# Altium PCB MCU.pcbdoc (part 2 of 2)
Units mil, origin at the board's own origin, x right, y up, seen from the top; angles counter-clockwise.
Board outline 2362.2 x 2637.8 mil, 2 copper layers (Top Layer, Bottom Layer), stack 62.2 mil thick; 37 components, 44 nets, 211 pads, 87 vias.
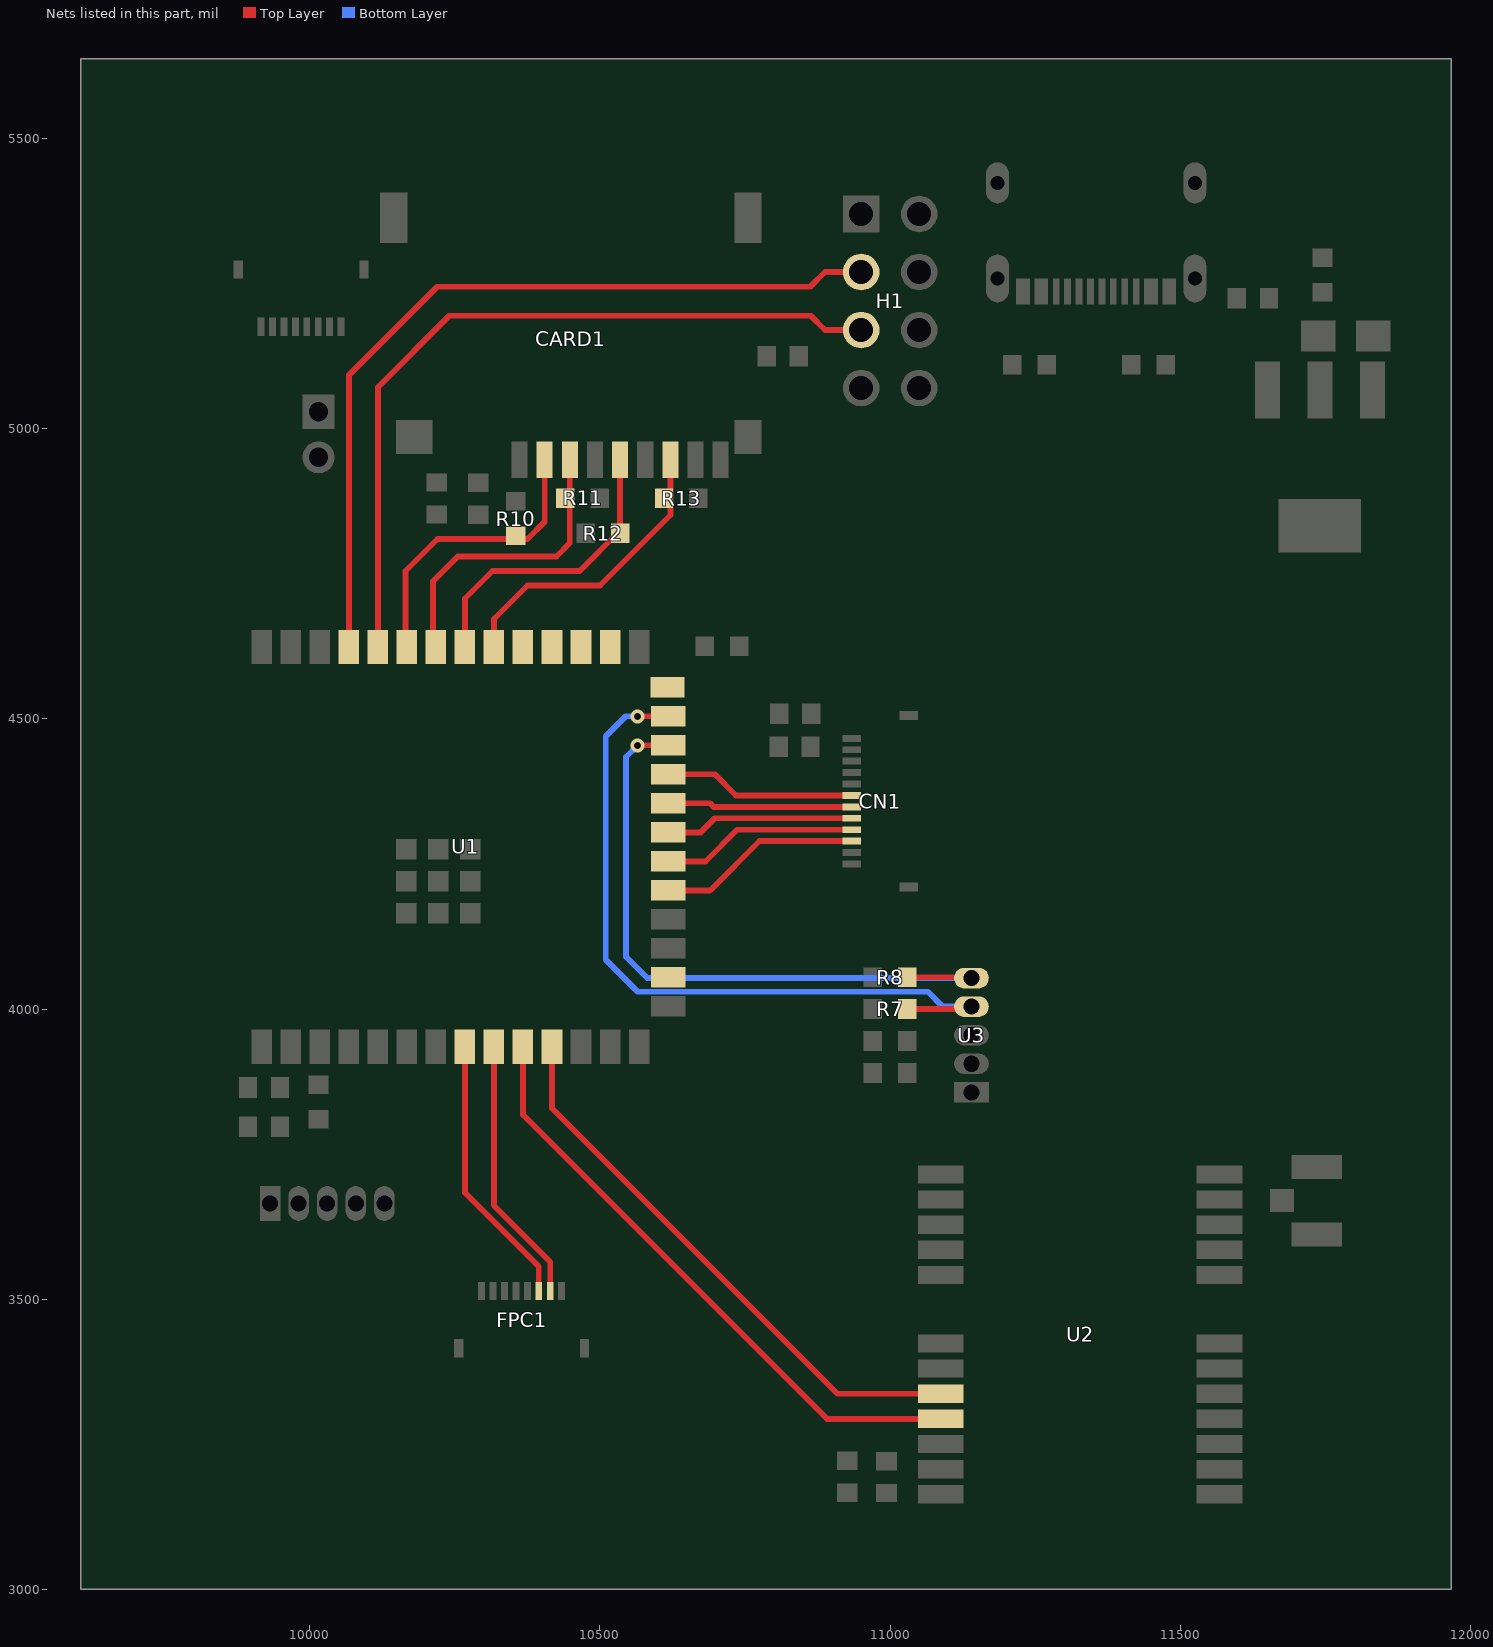
[diagram p2: the nets of this part, all layers, seen from the top]

## Via types
v1: diameter 24, hole 12, Top Layer to Bottom Layer, 87 vias

## Nets (pads, with @x,y where several pads share a name; then routed paths per layer and width w, separated by ;. In a path a pad name is that pad's centre, name@x,y a point inside that pad or via, vN(x,y) a via of type N, cw(c..) or ccw(c..) an arc to the next point about the centre after c; other vN are vias at no path point) (continued)
GPIO_11: CN1.3 U1.19 | length 351.2
  Top Layer w10: U1.19@10617.7,4204.5 10689.8,4204.5 10774.7,4289.4 CN1.3@10933.7,4289.4
GPIO_12: CN1.4 U1.20 | length 338.6
  Top Layer w10: U1.20@10617.7,4254.5 10681.7,4254.5 10736.2,4309.1 CN1.4@10933.7,4309.1
GPIO_13: CN1.5 U1.21 | length 326
  Top Layer w10: U1.21@10617.7,4304.5 10673.5,4304.5 10697.7,4328.7 CN1.5@10933.7,4328.7
GPIO_14: CN1.6 U1.22 | length 318.5
  Top Layer w10: U1.22@10617.7,4354.5 10689.8,4354.5 10695.9,4348.4 CN1.6@10933.7,4348.4
GPIO_15: FPC1.6 U1.8 | length 473.5
  Top Layer w10: U1.8@10267.3,3935 10267.3,3683.5 10394.5,3556.3 FPC1.6@10394.5,3514.2
GPIO_16: FPC1.7 U1.9 | length 460.9
  Top Layer w10: U1.9@10317.3,3935 10317.3,3661.3 10414.2,3564.4 FPC1.7@10414.2,3514.2
GPIO_17: U1.10 U2.21 | length 1054.1
  Top Layer w10: U1.10@10367.3,3935 10367.3,3817.7 10891.1,3293.9 U2.21@11087.1,3293.9
GPIO_18: U1.11 U2.20 | length 979.5
  Top Layer w10: U1.11@10417.3,3935 10417.3,3829 10909.1,3337.2 U2.20@11087.1,3337.2
GPIO_21: CN1.7 U1.23 | length 331.1
  Top Layer w10: U1.23@10617.7,4404.5 10698,4404.5 10734.4,4368.1 CN1.7@10933.7,4368.1
GPIO_35: U1.28
GPIO_36: U1.29
GPIO_37: U1.30
GPIO_38: U1.31
GPIO_39: CARD1.7 R13.1 U1.32 | length 521.4
  Top Layer w10: U1.32@10317.3,4624 10317.3,4672.3 10375,4730 10500,4730 10621.3,4851.3 CARD1.7@10621.3,4946.3
GPIO_40: CARD1.5 R12.1 U1.33 | length 520.9
  Top Layer w10: U1.33@10267.3,4624 10267.3,4707.3 10315,4755 10465,4755 10534.6,4824.6 CARD1.5@10534.6,4946.3
GPIO_41: CARD1.3 R11.1 U1.34 | length 521.6
  Top Layer w10: U1.34@10217.3,4624 10212.3,4629 10212.3,4737.3 10255,4780 10425,4780 10448,4803 CARD1.3@10448,4946.3
GPIO_42: CARD1.2 R10.1 U1.35 | length 513.3
  Top Layer w10: U1.35@10167.3,4624 10165,4626.3 10165,4755 10220,4810 10375,4810 10404.7,4839.7 CARD1.2@10404.7,4946.3
GPIO_45: U1.26
GPIO_46: U1.16
GPIO_47: R8.2 U1.24 U3.5 | length 1146.6
  Top Layer w10: v1(10565,4454.5) U1.24@10617.7,4454.5 ; R8.2@11029.7,4055 11138.4,4055 U3.5@11140,4053.4
  Bottom Layer w10: v1(10565,4454.5) 10545,4434.5 10545,4090 10581.6,4053.4 U3.5@11140,4053.4
GPIO_48: R7.2 U1.25 U3.4 | length 1282.5
  Top Layer w10: v1(10565,4504.5) U1.25@10617.7,4504.5 ; R7.2@11029.7,4000 11135.8,4000 U3.4@11140,4004.2
  Bottom Layer w10: v1(10565,4504.5) 10544.5,4504.5 10510,4470 10510,4085 10565,4030 11065,4030 11090.8,4004.2 U3.4@11140,4004.2
RXD0: H1.5 U1.36 | length 1341.4
  Top Layer w10: U1.36@10117.3,4624 10117.3,5071.6 10240.4,5194.6 10863.1,5194.6 10887.8,5170 H1.5@10950,5170
TXD0: H1.3 U1.37 | length 1424.6
  Top Layer w10: U1.37@10067.3,4624 10067.3,5092.3 10219.6,5244.6 10862.4,5244.6 10887.8,5270 H1.3@10950,5270
pads on no net: CARD1.1 CARD1.8 CARD1.CD CN1.10 CN1.11 U2.1 U2.2 U2.3 U2.4 U2.5 U2.6 U2.7 U2.8 U2.9 U2.14 U2.15 U2.16 U2.17 U2.18 U2.19 USB1.A8 USB1.B8

## Polygon pours and split planes (outlines as drawn)
GND on Top Layer (solid, remove dead copper, pour order 0): 9605,5637.8 9605,3000 11967.2,3000 11967.2,5637.8
GND on Bottom Layer (solid, remove dead copper, pour order 2): 9605,5637.8 9605,3000 11967.2,3000 11967.2,5637.8

## Keep-outs
Board Outline Layer:
  region: 9862.9,3196.9 9862.5,3189.9 9861.3,3183 9859.3,3176.3 9856.6,3169.9 9853.2,3163.9 9849.1,3158.2 9844.4,3153.1 9839.1,3148.5 9833.4,3144.6 9827.2,3141.3 9820.7,3138.8 9814,3137 9807.1,3136.1 9800.1,3135.9 9793.2,3136.4 9786.3,3137.8 9779.7,3140 9773.4,3142.9 9767.4,3146.5 9761.9,3150.7 9756.9,3155.6 9752.5,3161 9748.7,3166.8 9745.6,3173.1 9743.3,3179.7 9741.7,3186.4 9740.9,3193.4 9740.9,3200.3 9741.7,3207.3 9743.3,3214 9745.6,3220.6 9748.7,3226.9 9752.5,3232.7 9756.9,3238.1 9761.9,3243 9767.4,3247.2 9773.4,3250.8 9779.7,3253.7 9786.3,3255.9 9793.2,3257.3 9800.1,3257.8 9807.1,3257.7 9814,3256.7 9820.7,3254.9 9827.2,3252.4 9833.4,3249.1 9839.1,3245.2 9844.4,3240.6 9849.1,3235.5 9853.2,3229.8 9856.6,3223.8 9859.3,3217.4 9861.3,3210.7 9862.5,3203.8
  region: 9862.9,3196.9 9862.5,3189.9 9861.3,3183 9859.3,3176.3 9856.6,3169.9 9853.2,3163.9 9849.1,3158.2 9844.4,3153.1 9839.1,3148.5 9833.4,3144.6 9827.2,3141.3 9820.7,3138.8 9814,3137 9807.1,3136.1 9800.1,3135.9 9793.2,3136.4 9786.3,3137.8 9779.7,3140 9773.4,3142.9 9767.4,3146.5 9761.9,3150.7 9756.9,3155.6 9752.5,3161 9748.7,3166.8 9745.6,3173.1 9743.3,3179.7 9741.7,3186.4 9740.9,3193.4 9740.9,3200.3 9741.7,3207.3 9743.3,3214 9745.6,3220.6 9748.7,3226.9 9752.5,3232.7 9756.9,3238.1 9761.9,3243 9767.4,3247.2 9773.4,3250.8 9779.7,3253.7 9786.3,3255.9 9793.2,3257.3 9800.1,3257.8 9807.1,3257.7 9814,3256.7 9820.7,3254.9 9827.2,3252.4 9833.4,3249.1 9839.1,3245.2 9844.4,3240.6 9849.1,3235.5 9853.2,3229.8 9856.6,3223.8 9859.3,3217.4 9861.3,3210.7 9862.5,3203.8
  region: 9862.9,5440.9 9862.5,5434 9861.3,5427.1 9859.3,5420.4 9856.6,5414 9853.2,5408 9849.1,5402.3 9844.4,5397.2 9839.1,5392.6 9833.4,5388.7 9827.2,5385.4 9820.7,5382.9 9814,5381.1 9807.1,5380.1 9800.1,5379.9 9793.2,5380.5 9786.3,5381.9 9779.7,5384.1 9773.4,5387 9767.4,5390.6 9761.9,5394.8 9756.9,5399.7 9752.5,5405.1 9748.7,5410.9 9745.6,5417.2 9743.3,5423.8 9741.7,5430.5 9740.9,5437.5 9740.9,5444.4 9741.7,5451.4 9743.3,5458.1 9745.6,5464.7 9748.7,5471 9752.5,5476.8 9756.9,5482.2 9761.9,5487.1 9767.4,5491.3 9773.4,5494.9 9779.7,5497.8 9786.3,5500 9793.2,5501.3 9800.1,5501.9 9807.1,5501.7 9814,5500.8 9820.7,5499 9827.2,5496.5 9833.4,5493.2 9839.1,5489.3 9844.4,5484.7 9849.1,5479.6 9853.2,5473.9 9856.6,5467.9 9859.3,5461.5 9861.3,5454.8 9862.5,5447.9
  region: 9862.9,5440.9 9862.5,5434 9861.3,5427.1 9859.3,5420.4 9856.6,5414 9853.2,5408 9849.1,5402.3 9844.4,5397.2 9839.1,5392.6 9833.4,5388.7 9827.2,5385.4 9820.7,5382.9 9814,5381.1 9807.1,5380.1 9800.1,5379.9 9793.2,5380.5 9786.3,5381.9 9779.7,5384.1 9773.4,5387 9767.4,5390.6 9761.9,5394.8 9756.9,5399.7 9752.5,5405.1 9748.7,5410.9 9745.6,5417.2 9743.3,5423.8 9741.7,5430.5 9740.9,5437.5 9740.9,5444.4 9741.7,5451.4 9743.3,5458.1 9745.6,5464.7 9748.7,5471 9752.5,5476.8 9756.9,5482.2 9761.9,5487.1 9767.4,5491.3 9773.4,5494.9 9779.7,5497.8 9786.3,5500 9793.2,5501.3 9800.1,5501.9 9807.1,5501.7 9814,5500.8 9820.7,5499 9827.2,5496.5 9833.4,5493.2 9839.1,5489.3 9844.4,5484.7 9849.1,5479.6 9853.2,5473.9 9856.6,5467.9 9859.3,5461.5 9861.3,5454.8 9862.5,5447.9
  region: 11831.4,3196.9 11831,3189.9 11829.8,3183 11827.8,3176.3 11825.1,3169.9 11821.7,3163.9 11817.6,3158.2 11812.9,3153.1 11807.6,3148.5 11801.9,3144.6 11795.7,3141.3 11789.2,3138.8 11782.5,3137 11775.6,3136.1 11768.6,3135.9 11761.7,3136.4 11754.8,3137.8 11748.2,3140 11741.9,3142.9 11735.9,3146.5 11730.4,3150.7 11725.4,3155.6 11721,3161 11717.2,3166.8 11714.1,3173.1 11711.8,3179.7 11710.2,3186.4 11709.4,3193.4 11709.4,3200.3 11710.2,3207.3 11711.8,3214 11714.1,3220.6 11717.2,3226.9 11721,3232.7 11725.4,3238.1 11730.4,3243 11735.9,3247.2 11741.9,3250.8 11748.2,3253.7 11754.8,3255.9 11761.7,3257.3 11768.6,3257.8 11775.6,3257.7 11782.5,3256.7 11789.2,3254.9 11795.7,3252.4 11801.9,3249.1 11807.6,3245.2 11812.9,3240.6 11817.6,3235.5 11821.7,3229.8 11825.1,3223.8 11827.8,3217.4 11829.8,3210.7 11831,3203.8
  region: 11831.4,3196.9 11831,3189.9 11829.8,3183 11827.8,3176.3 11825.1,3169.9 11821.7,3163.9 11817.6,3158.2 11812.9,3153.1 11807.6,3148.5 11801.9,3144.6 11795.7,3141.3 11789.2,3138.8 11782.5,3137 11775.6,3136.1 11768.6,3135.9 11761.7,3136.4 11754.8,3137.8 11748.2,3140 11741.9,3142.9 11735.9,3146.5 11730.4,3150.7 11725.4,3155.6 11721,3161 11717.2,3166.8 11714.1,3173.1 11711.8,3179.7 11710.2,3186.4 11709.4,3193.4 11709.4,3200.3 11710.2,3207.3 11711.8,3214 11714.1,3220.6 11717.2,3226.9 11721,3232.7 11725.4,3238.1 11730.4,3243 11735.9,3247.2 11741.9,3250.8 11748.2,3253.7 11754.8,3255.9 11761.7,3257.3 11768.6,3257.8 11775.6,3257.7 11782.5,3256.7 11789.2,3254.9 11795.7,3252.4 11801.9,3249.1 11807.6,3245.2 11812.9,3240.6 11817.6,3235.5 11821.7,3229.8 11825.1,3223.8 11827.8,3217.4 11829.8,3210.7 11831,3203.8
  region: 11831.4,5440.9 11831,5434 11829.8,5427.1 11827.8,5420.4 11825.1,5414 11821.7,5408 11817.6,5402.3 11812.9,5397.2 11807.6,5392.6 11801.9,5388.7 11795.7,5385.4 11789.2,5382.9 11782.5,5381.1 11775.6,5380.1 11768.6,5379.9 11761.7,5380.5 11754.8,5381.9 11748.2,5384.1 11741.9,5387 11735.9,5390.6 11730.4,5394.8 11725.4,5399.7 11721,5405.1 11717.2,5410.9 11714.1,5417.2 11711.8,5423.8 11710.2,5430.5 11709.4,5437.5 11709.4,5444.4 11710.2,5451.4 11711.8,5458.1 11714.1,5464.7 11717.2,5471 11721,5476.8 11725.4,5482.2 11730.4,5487.1 11735.9,5491.3 11741.9,5494.9 11748.2,5497.8 11754.8,5500 11761.7,5501.3 11768.6,5501.9 11775.6,5501.7 11782.5,5500.8 11789.2,5499 11795.7,5496.5 11801.9,5493.2 11807.6,5489.3 11812.9,5484.7 11817.6,5479.6 11821.7,5473.9 11825.1,5467.9 11827.8,5461.5 11829.8,5454.8 11831,5447.9
  region: 11831.4,5440.9 11831,5434 11829.8,5427.1 11827.8,5420.4 11825.1,5414 11821.7,5408 11817.6,5402.3 11812.9,5397.2 11807.6,5392.6 11801.9,5388.7 11795.7,5385.4 11789.2,5382.9 11782.5,5381.1 11775.6,5380.1 11768.6,5379.9 11761.7,5380.5 11754.8,5381.9 11748.2,5384.1 11741.9,5387 11735.9,5390.6 11730.4,5394.8 11725.4,5399.7 11721,5405.1 11717.2,5410.9 11714.1,5417.2 11711.8,5423.8 11710.2,5430.5 11709.4,5437.5 11709.4,5444.4 11710.2,5451.4 11711.8,5458.1 11714.1,5464.7 11717.2,5471 11721,5476.8 11725.4,5482.2 11730.4,5487.1 11735.9,5491.3 11741.9,5494.9 11748.2,5497.8 11754.8,5500 11761.7,5501.3 11768.6,5501.9 11775.6,5501.7 11782.5,5500.8 11789.2,5499 11795.7,5496.5 11801.9,5493.2 11807.6,5489.3 11812.9,5484.7 11817.6,5479.6 11821.7,5473.9 11825.1,5467.9 11827.8,5461.5 11829.8,5454.8 11831,5447.9
  region: 9605,5637.8 9605,3000 9858.4,3000 9858.4,5637.8
  region: 9879,3475.6 ccw(c9879,3455.9) 9859.3,3455.9 9859.3,3337.8 ccw(c9879,3337.8) 9879,3318.1 10194,3318.1 ccw(c10194,3337.8) 10213.7,3337.8 10213.7,3455.9 ccw(c10194,3455.9) 10194,3475.6 9879,3475.6
  region: 9879,3475.6 ccw(c9879,3455.9) 9859.3,3455.9 9859.3,3337.8 ccw(c9879,3337.8) 9879,3318.1 10194,3318.1 ccw(c10194,3337.8) 10213.7,3337.8 10213.7,3455.9 ccw(c10194,3455.9) 10194,3475.6 9879,3475.6
  region: 11401.3,3787.5 ccw(c11420.9,3787.5) 11420.9,3767.8 11539.1,3767.8 ccw(c11539.1,3787.5) 11558.7,3787.5 11558.7,4102.5 ccw(c11539.1,4102.5) 11539.1,4122.2 11420.9,4122.2 ccw(c11420.9,4102.5) 11401.3,4102.5
  region: 11401.3,3787.5 ccw(c11420.9,3787.5) 11420.9,3767.8 11539.1,3767.8 ccw(c11539.1,3787.5) 11558.7,3787.5 11558.7,4102.5 ccw(c11539.1,4102.5) 11539.1,4122.2 11420.9,4122.2 ccw(c11420.9,4102.5) 11401.3,4102.5
  region: 11189.6,4555.1 ccw(c11189.6,4545.3) 11179.8,4545.3 11179.8,4171.3 ccw(c11189.6,4171.3) 11189.6,4161.4 11248.7,4161.4 ccw(c11248.7,4171.3) 11258.5,4171.3 11258.5,4545.3 ccw(c11248.7,4545.3) 11248.7,4555.1 11189.6,4555.1
  region: 11189.6,4555.1 ccw(c11189.6,4545.3) 11179.8,4545.3 11179.8,4171.3 ccw(c11189.6,4171.3) 11189.6,4161.4 11248.7,4161.4 ccw(c11248.7,4171.3) 11258.5,4171.3 11258.5,4545.3 ccw(c11248.7,4545.3) 11248.7,4555.1 11189.6,4555.1
  region: 10244.8,3285 ccw(c10244.8,3275.2) 10235,3275.2 10235,3216.1 ccw(c10244.8,3216.1) 10244.8,3206.3 10481.1,3206.3 ccw(c10481.1,3216.1) 10490.9,3216.1 10490.9,3275.2 ccw(c10481.1,3275.2) 10481.1,3285 10244.8,3285
  region: 10244.8,3285 ccw(c10244.8,3275.2) 10235,3275.2 10235,3216.1 ccw(c10244.8,3216.1) 10244.8,3206.3 10481.1,3206.3 ccw(c10481.1,3216.1) 10490.9,3216.1 10490.9,3275.2 ccw(c10481.1,3275.2) 10481.1,3285 10244.8,3285
  region: 9864.3,5637.8 9864.3,5610.2 10120.2,5610.2 10120.2,5637.8
  region: 9864.3,5637.8 9864.3,5610.2 10120.2,5610.2 10120.2,5637.8
  region: 11941.6,4555.1 ccw(c11941.6,4553.1) 11939.6,4553.1 11939.6,4163.4 ccw(c11941.6,4163.4) 11941.6,4161.4 11965.2,4161.4 ccw(c11965.2,4163.4) 11967.2,4163.4 11967.2,4553.1 ccw(c11965.2,4553.1) 11965.2,4555.1
  region: 11941.6,4555.1 ccw(c11941.6,4553.1) 11939.6,4553.1 11939.6,4163.4 ccw(c11941.6,4163.4) 11941.6,4161.4 11965.2,4161.4 ccw(c11965.2,4163.4) 11967.2,4163.4 11967.2,4553.1 ccw(c11965.2,4553.1) 11965.2,4555.1
  region: 10236.9,3027.6 ccw(c10236.9,3025.6) 10234.9,3025.6 10234.9,3002 ccw(c10236.9,3002) 10236.9,3000 10488.9,3000 ccw(c10488.9,3002) 10490.8,3002 10490.8,3025.6 ccw(c10488.9,3025.6) 10488.9,3027.6 10236.9,3027.6
  region: 10236.9,3027.6 ccw(c10236.9,3025.6) 10234.9,3025.6 10234.9,3002 ccw(c10236.9,3002) 10236.9,3000 10488.9,3000 ccw(c10488.9,3002) 10490.8,3002 10490.8,3025.6 ccw(c10488.9,3025.6) 10488.9,3027.6 10236.9,3027.6
  lines w0.1: 10490.9,3002 cw(c10488.9,3002) 10488.9,3000 ; 10490.9,3025.6 ccw(c10488.9,3025.6) 10488.9,3027.6 ; 11189.6,4161.5 cw(c11189.6,4171.3) 11179.8,4171.3 ; 11248.7,4161.5 ccw(c11248.7,4171.3) 11258.5,4171.3 ; 11401.2,3787.5 ccw(c11420.9,3787.5) 11420.9,3767.8 11539.1,3767.8 ccw(c11539.1,3787.5) 11558.8,3787.5 ; 11401.2,4102.5 cw(c11420.9,4102.5) 11420.9,4122.2 ; 11401.3,3787.5 11401.3,4102.5 ; 11558.7,3787.5 11558.7,4102.5 ; 11558.8,4102.5 ccw(c11539.1,4102.5) 11539.1,4122.2 ; 9859.3,3337.8 9859.3,3455.9 ; 9859.3,3337.8 9859.3,3337.8 ; 9859.3,3337.8 ccw(c9879,3337.8) 9879,3318.1 ; 9859.3,3455.9 cw(c9879,3455.9) 9879,3475.6 10194,3475.6 cw(c10194,3455.9) 10213.7,3455.9 10213.7,3337.8 cw(c10194,3337.8) 10194,3318.1 9879,3318.1 ; 9859.3,3455.9 9859.3,3455.9 ; 9879,3318.1 9879,3318.1 ; 10234.9,3002 10234.9,3025.6 ; 10234.9,3002 10234.9,3002 ; 10234.9,3002 ccw(c10236.9,3002) 10236.9,3000 ; 10234.9,3025.6 cw(c10236.9,3025.6) 10236.9,3027.6 10488.9,3027.6 ; 10234.9,3025.6 10234.9,3025.6 ; 10236.9,3000 10236.9,3000 ; 10236.9,3000 10488.9,3000 ; 10244.8,3206.3 cw(c10244.8,3216.1) 10235,3216.1 10235,3275.2 cw(c10244.8,3275.2) 10244.8,3285 10481.1,3285 ; 10244.8,3206.3 10244.8,3206.3 ; 10244.8,3206.3 10481.1,3206.3 ; 10481.1,3206.3 10481.1,3206.3 ; 10481.1,3206.3 ccw(c10481.1,3216.1) 10490.9,3216.1 ; 10481.1,3285 cw(c10481.1,3275.2) 10490.9,3275.2 ; 10481.1,3285 10481.1,3285 ; 10488.9,3000 10488.9,3000 ; 10488.9,3027.6 10488.9,3027.6 ; 10490.8,3002 10490.8,3002 ; 10490.8,3002 10490.8,3025.6 ; 10490.8,3025.6 10490.8,3025.6 ; 10490.9,3216.1 10490.9,3216.1 ; 10490.9,3216.1 10490.9,3275.2 ; 10490.9,3275.2 10490.9,3275.2 ; 11179.8,4171.3 11179.8,4545.3 ; 11179.8,4171.3 11179.8,4171.3 ; 11179.8,4545.3 cw(c11189.6,4545.3) 11189.6,4555.1 11248.7,4555.1 cw(c11248.7,4545.3) 11258.5,4545.3 11258.5,4171.3 ; 11179.8,4545.3 11179.8,4545.3 ; 11189.6,4161.4 11189.6,4161.4 ; 11189.6,4161.4 11248.7,4161.4 ; 11248.7,4161.4 11248.7,4161.4 ; 11258.5,4171.3 11258.5,4171.3 ; 11401.3,4102.5 11401.3,4102.5 ; 11420.9,4122.2 11539.1,4122.2 ; 11420.9,4122.2 11420.9,4122.2 ; 11539.1,4122.2 11539.1,4122.2 ; 11558.7,4102.5 11558.7,4102.5 ; 11939.6,4163.4 11939.6,4553.1 cw(c11941.6,4553.1) 11941.6,4555.1 11965.2,4555.1 ; 11939.6,4163.4 11939.6,4163.4 ; 11939.6,4163.4 ccw(c11941.6,4163.4) 11941.6,4161.4 ; 11941.6,4161.4 11941.6,4161.4 ; 11941.6,4161.4 11965.2,4161.4 ; 11965.2,4161.4 11965.2,4161.4 ; 11965.2,4161.4 ccw(c11965.2,4163.4) 11967.2,4163.4 ; 11965.2,4555.1 cw(c11965.2,4553.1) 11967.2,4553.1 ; 11965.2,4555.1 11965.2,4555.1 ; 11967.2,4163.4 11967.2,4163.4 ; 11967.2,4163.4 11967.2,4553.1 ; 11967.2,4553.1 11967.2,4553.1 ; 9740.9,3193.4 9741.7,3186.4 9743.3,3179.7 9745.6,3173.1 9748.7,3166.8 9752.5,3161 9756.9,3155.6 9761.9,3150.7 9767.4,3146.5 9773.4,3142.9 9779.7,3140 9786.3,3137.8 9793.2,3136.4 9800.1,3135.9 9807.1,3136.1 9814,3137 9820.7,3138.8 9827.2,3141.3 9833.4,3144.6 9839.1,3148.5 9844.4,3153.1 9849.1,3158.2 9853.2,3163.9 9856.6,3169.9 9859.3,3176.3 9861.3,3183 9862.5,3189.9 9862.9,3196.9 9862.5,3203.8 9861.3,3210.7 9859.3,3217.4 9856.6,3223.8 9853.2,3229.8 9849.1,3235.5 9844.4,3240.6 9839.1,3245.2 9833.4,3249.1 9827.2,3252.4 9820.7,3254.9 9814,3256.7 9807.1,3257.7 9800.1,3257.8 9793.2,3257.3 9786.3,3255.9 9779.7,3253.7 9773.4,3250.8 9767.4,3247.2 9761.9,3243 9756.9,3238.1 9752.5,3232.7 9748.7,3226.9 9745.6,3220.6 9743.3,3214 9741.7,3207.3 9740.9,3200.3 9740.9,3193.4 ; 9740.9,5437.5 9741.7,5430.5 9743.3,5423.8 9745.6,5417.2 9748.7,5410.9 9752.5,5405.1 9756.9,5399.7 9761.9,5394.8 9767.4,5390.6 9773.4,5387 9779.7,5384.1 9786.3,5381.9 9793.2,5380.5 9800.1,5379.9 9807.1,5380.1 9814,5381.1 9820.7,5382.9 9827.2,5385.4 9833.4,5388.7 9839.1,5392.6 9844.4,5397.2 9849.1,5402.3 9853.2,5408 9856.6,5414 9859.3,5420.4 9861.3,5427.1 9862.5,5434 9862.9,5440.9 9862.5,5447.9 9861.3,5454.8 9859.3,5461.5 9856.6,5467.9 9853.2,5473.9 9849.1,5479.6 9844.4,5484.7 9839.1,5489.3 9833.4,5493.2 9827.2,5496.5 9820.7,5499 9814,5500.8 9807.1,5501.7 9800.1,5501.9 9793.2,5501.3 9786.3,5500 9779.7,5497.8 9773.4,5494.9 9767.4,5491.3 9761.9,5487.1 9756.9,5482.2 9752.5,5476.8 9748.7,5471 9745.6,5464.7 9743.3,5458.1 9741.7,5451.4 9740.9,5444.4 9740.9,5437.5 ; 9864.3,5610.2 9864.3,5637.8 10120.2,5637.8 10120.2,5610.2 9864.3,5610.2 ; 11709.4,3193.4 11710.2,3186.4 11711.8,3179.7 11714.1,3173.1 11717.2,3166.8 11721,3161 11725.4,3155.6 11730.4,3150.7 11735.9,3146.5 11741.9,3142.9 11748.2,3140 11754.8,3137.8 11761.7,3136.4 11768.6,3135.9 11775.6,3136.1 11782.5,3137 11789.2,3138.8 11795.7,3141.3 11801.9,3144.6 11807.6,3148.5 11812.9,3153.1 11817.6,3158.2 11821.7,3163.9 11825.1,3169.9 11827.8,3176.3 11829.8,3183 11831,3189.9 11831.4,3196.9 11831,3203.8 11829.8,3210.7 11827.8,3217.4 11825.1,3223.8 11821.7,3229.8 11817.6,3235.5 11812.9,3240.6 11807.6,3245.2 11801.9,3249.1 11795.7,3252.4 11789.2,3254.9 11782.5,3256.7 11775.6,3257.7 11768.6,3257.8 11761.7,3257.3 11754.8,3255.9 11748.2,3253.7 11741.9,3250.8 11735.9,3247.2 11730.4,3243 11725.4,3238.1 11721,3232.7 11717.2,3226.9 11714.1,3220.6 11711.8,3214 11710.2,3207.3 11709.4,3200.3 11709.4,3193.4 ; 11709.4,5437.5 11710.2,5430.5 11711.8,5423.8 11714.1,5417.2 11717.2,5410.9 11721,5405.1 11725.4,5399.7 11730.4,5394.8 11735.9,5390.6 11741.9,5387 11748.2,5384.1 11754.8,5381.9 11761.7,5380.5 11768.6,5379.9 11775.6,5380.1 11782.5,5381.1 11789.2,5382.9 11795.7,5385.4 11801.9,5388.7 11807.6,5392.6 11812.9,5397.2 11817.6,5402.3 11821.7,5408 11825.1,5414 11827.8,5420.4 11829.8,5427.1 11831,5434 11831.4,5440.9 11831,5447.9 11829.8,5454.8 11827.8,5461.5 11825.1,5467.9 11821.7,5473.9 11817.6,5479.6 11812.9,5484.7 11807.6,5489.3 11801.9,5493.2 11795.7,5496.5 11789.2,5499 11782.5,5500.8 11775.6,5501.7 11768.6,5501.9 11761.7,5501.3 11754.8,5500 11748.2,5497.8 11741.9,5494.9 11735.9,5491.3 11730.4,5487.1 11725.4,5482.2 11721,5476.8 11717.2,5471 11714.1,5464.7 11711.8,5458.1 11710.2,5451.4 11709.4,5444.4 11709.4,5437.5
  lines w10: 11965.2,3000 9607,3000 cw(c9607,3002) 9605,3002 9605,5635.8 cw(c9607,5635.8) 9607,5637.8 11965.2,5637.8 ; 11965.2,3000 11965.2,3000 ; 11965.2,3000 ccw(c11965.2,3002) 11967.2,3002 ; 11965.2,5637.8 cw(c11965.2,5635.8) 11967.2,5635.8 ; 11965.2,5637.8 11965.2,5637.8 ; 11967.2,3002 11967.2,3002 ; 11967.2,3002 11967.2,5635.8 ; 11967.2,5635.8 11967.2,5635.8

## Other copper
Top Layer:
  drawing of 175 lines, arcs and shapes, not listed
Bottom Layer:
  region net 3V3: 10010,5190 10010,5220 10018.8,5228.8 10072.4,5228.8 10080,5221.3 10080,5130 10075,5125 10015,5125 10010,5130
  region net 3V3: 9935,3813.1 9985.9,3813.1 9997.3,3824.4 10030.7,3824.4 10030.7,3791 9995.6,3755.8 9951.9,3755.8 9935,3772.8
  region net EN: 10955,5027.1 10945,5027.1 10943.4,5029.3 10939.2,5034.4 10926.4,5049.2 10973.6,5049.2 10960.8,5034.4 10956.6,5029.3
  region net 3V3: 11093.8,5283.8 11092,5253.8 11089.5,5253.6 11086.7,5253.1 11083.7,5252.3 11080.6,5251.2 11077.5,5250 11074.6,5248.6 11072.1,5247.1 11069.9,5245.6 11071.7,5292.8 11073.8,5291.1 11076.3,5289.5 11079.1,5288 11082.2,5286.6 11085.3,5285.5 11088.3,5284.6 11091.2,5284
  region net GPIO_47: 11100.2,4048.4 11100.2,4058.4 11101.7,4058.6 11103.6,4059.1 11105.6,4059.8 11107.7,4060.8 11109.8,4061.9 11111.8,4063.2 11113.6,4064.5 11115.2,4065.9 11115.2,4040.9 11113.6,4042.3 11111.8,4043.7 11109.8,4044.9 11107.7,4046.1 11105.6,4047 11103.6,4047.8 11101.7,4048.3
  region net GPIO_48: 11100.2,3999.2 11100.2,4009.2 11101.7,4009.4 11103.6,4009.9 11105.6,4010.6 11107.7,4011.6 11109.8,4012.7 11111.8,4014 11113.6,4015.3 11115.2,4016.7 11115.2,3991.7 11113.6,3993.1 11111.8,3994.5 11109.8,3995.7 11107.7,3996.9 11105.6,3997.8 11103.6,3998.6 11101.7,3999
  region net GPIO_08: 11100.2,3900.8 11100.2,3910.8 11101.7,3911 11103.6,3911.4 11105.6,3912.2 11107.7,3913.1 11109.8,3914.3 11111.8,3915.5 11113.6,3916.9 11115.2,3918.3 11115.2,3893.3 11113.6,3894.7 11111.8,3896 11109.8,3897.3 11107.7,3898.4 11105.6,3899.4 11103.6,3900.1 11101.7,3900.6
  region net 3V3: 9977.5,4935.6 9977.5,4965.6 9980,4965.8 9982.8,4966.1 9985.6,4966.7 9988.3,4967.4 9991,4968.3 9993.3,4969.2 9995.3,4970.2 9996.8,4971.3 9996.8,4930 9995.3,4931 9993.3,4932 9991,4933 9988.3,4933.9 9985.6,4934.6 9982.8,4935.1 9980,4935.5
  region net 3V3: 10048.6,4931.2 10034.5,4917 10033.1,4918 10031.2,4919 10028.8,4919.9 10025.9,4920.8 10022.8,4921.6 10019.6,4922.3 10016.4,4922.8 10013.3,4923.1 10042.5,4952.4 10042.8,4949.2 10043.3,4946 10044,4942.8 10044.8,4939.7 10045.7,4936.9 10046.6,4934.4 10047.6,4932.5
  region net 3V3: 10155.6,4896.9 10155.6,4916.9 10157.7,4917 10159.9,4917.3 10163.9,4917.9 10167.3,4918.6 10170,4919 10170,4894.9 10167.3,4895.3 10163.9,4895.9 10159.9,4896.6 10157.7,4896.9
  region net 3V3: 10879.4,4590 10879.4,4570 10877.3,4569.9 10875.1,4569.7 10871.1,4569 10867.7,4568.3 10865,4568 10865,4592 10867.7,4591.7 10871.1,4591 10875.1,4590.3 10877.3,4590.1
  region net GPIO_08: 10496.3,4010 10496.3,4000 10494.5,3999.7 10492.3,3998.7 10489.9,3997.5 10487.9,3996 10487.9,4014 10489.9,4012.5 10492.3,4011.3 10494.5,4010.3
  region net GPIO_47: 10557,4439.4 10549.9,4446.5 10550.9,4448 10551.9,4450.3 10552.6,4452.8 10553,4455.3 10565.8,4442.5 10563.3,4442.2 10560.7,4441.4 10558.5,4440.5
  region net GPIO_48: 10548.7,4499.5 10548.7,4509.5 10550.5,4509.9 10552.7,4510.8 10555.1,4512.1 10557.1,4513.5 10557.1,4495.5 10555.1,4497 10552.7,4498.3 10550.5,4499.2
  region net 3V3: 11014.7,4130 11014.7,4110 11012.6,4109.9 11010.5,4109.7 11006.5,4109 11003,4108.3 11000.3,4108 11000.3,4132 11003,4131.7 11006.5,4131 11010.5,4130.3 11012.6,4130.1
  region net EN: 10548,4585.1 10555.1,4578 10554.1,4576.5 10553.1,4574.3 10552.4,4571.7 10552,4569.2 10539.2,4582 10541.7,4582.4 10544.3,4583.1 10546.5,4584.1
  region net 3V3: 10015,4965.6 10009.3,4966 10003.6,4967 9998.2,4968.6 9992.9,4970.9 9988,4973.8 9983.4,4977.3 9979.3,4981.2 9975.6,4985.7 9972.5,4990.5 9970,4995.6 9955,4948.4 9970,4905.6 9972.5,4910.8 9975.6,4915.6 9979.3,4920 9983.4,4924 9988,4927.4 9992.9,4930.3 9998.2,4932.6 10003.6,4934.3 10009.3,4935.3 10015,4935.6
  region net 3V3: 11116.2,5356.5 11115.8,5348.9 11114.6,5341.3 11112.7,5334 11109.9,5326.8 11106.5,5320 11102.4,5313.6 11097.6,5307.7 11092.2,5302.3 11086.3,5297.5 11079.9,5293.3 11073.2,5289.8 11066.1,5287 11058.7,5285 11051.2,5283.8 11051.2,5253.8 11059,5251.4 11066.6,5248.4 11073.9,5244.7 11080.9,5240.4 11087.4,5235.4 11093.5,5230 11099.1,5224 11104.1,5217.5 11108.5,5210.6 11112.3,5203.4 11115.5,5195.9 11118,5188.1 11119.8,5180.1 11120.9,5172 11121.2,5163.8 11141.2,5167.6 11143.3,5259.9 11116.2,5356.5
  region net 3V3: 11061.2,4590 11069.2,4590.3 11077.2,4591.3 11085.1,4592.9 11092.8,4595.1 11100.4,4598 11107.6,4601.4 11114.6,4605.4 11121.2,4610 11131.2,4580 11121.2,4550 11114.6,4554.6 11107.6,4558.6 11100.4,4562 11092.8,4564.9 11085.1,4567.1 11077.2,4568.7 11069.2,4569.7 11061.2,4570 11061.2,4590
  region net 3V3: 11141.2,5228.1 11121.2,5228.1 11121.1,5243.1 11120.7,5258.1 11141.7,5258.1 11141.3,5243.1 11141.2,5228.1
  region net 3V3: 11236.2,5330 11225.5,5329.6 11214.8,5328.5 11204.3,5326.6 11193.9,5323.9 11183.7,5320.5 11173.8,5316.4 11164.2,5311.6 11155,5306.1 11146.2,5300 11131.2,5345 11236.2,5330

## Silkscreen, mask and mechanical layers (free items; w line width, h text height)
Top Silkscreen Layer:
  text "3V3 IN" at 9905,5360 h45
  text "- +" at 10075,5030 h45 r270
  text "E R T G / B G 3 5" at 11095,4800 h45 r90
  text "GVRRV →" at 11065,4640 h45 r270
  text "LCD" at 11060,4280 h45 r270
  text "SW" at 11380,3920 h45 r90
  text "GNSS ANT" at 11815,3760 h45 r270
  text "UART2" at 10030,3711 h45
  text "IMU" at 10325,3555 h45
  text "GT-IO18 / GR-IO17" at 10910,3325 h30
  text "UART2  / G 3V3 IO4 IO5 G" at 9865,3220 h40
Bottom Silkscreen Layer:
  text "U6 1117-3.3 / R9 0R 0603 / C10 10uf 0603 / C11 22uf 3216" at 11868.4,4877.2 h45
  text "LOGIC: 3.3V /  / LCD: CLK12 DIN11 CS13 /      DC14 RST10 TE21 /  / SD:  CLK40 MOSI41 MISO39 CS42 /  / SENSOR: SDA6 SCL7 / IMU: 0x6A  INT15 / MAG: 0x30  INT16 /  / POWER I2C: SDA2 SCL1 /  / GNSS: TX17 RX18 /  / KEY: SW1=47 SW2=48 /      SW3=9  SW4=8  ACTIVE LOW /  / RESET: EN=LOW / DOWNLOAD: IO0=LOW + RESET" at 11070,3720 h60
Mechanical Layer:
  drawing of 302 lines, arcs and shapes, not listed